# Altium PCB VCU 2026 PCB SID.PcbDoc (part 1 of 2)
Units mm, origin at the board's own origin, x right, y up, seen from the top; angles counter-clockwise.
Board outline 180 x 100 mm, 2 copper layers (Top Layer, Bottom Layer); 108 components, 87 nets, 411 pads, 271 vias.
Unrouted connection lines stored in the file: 2.
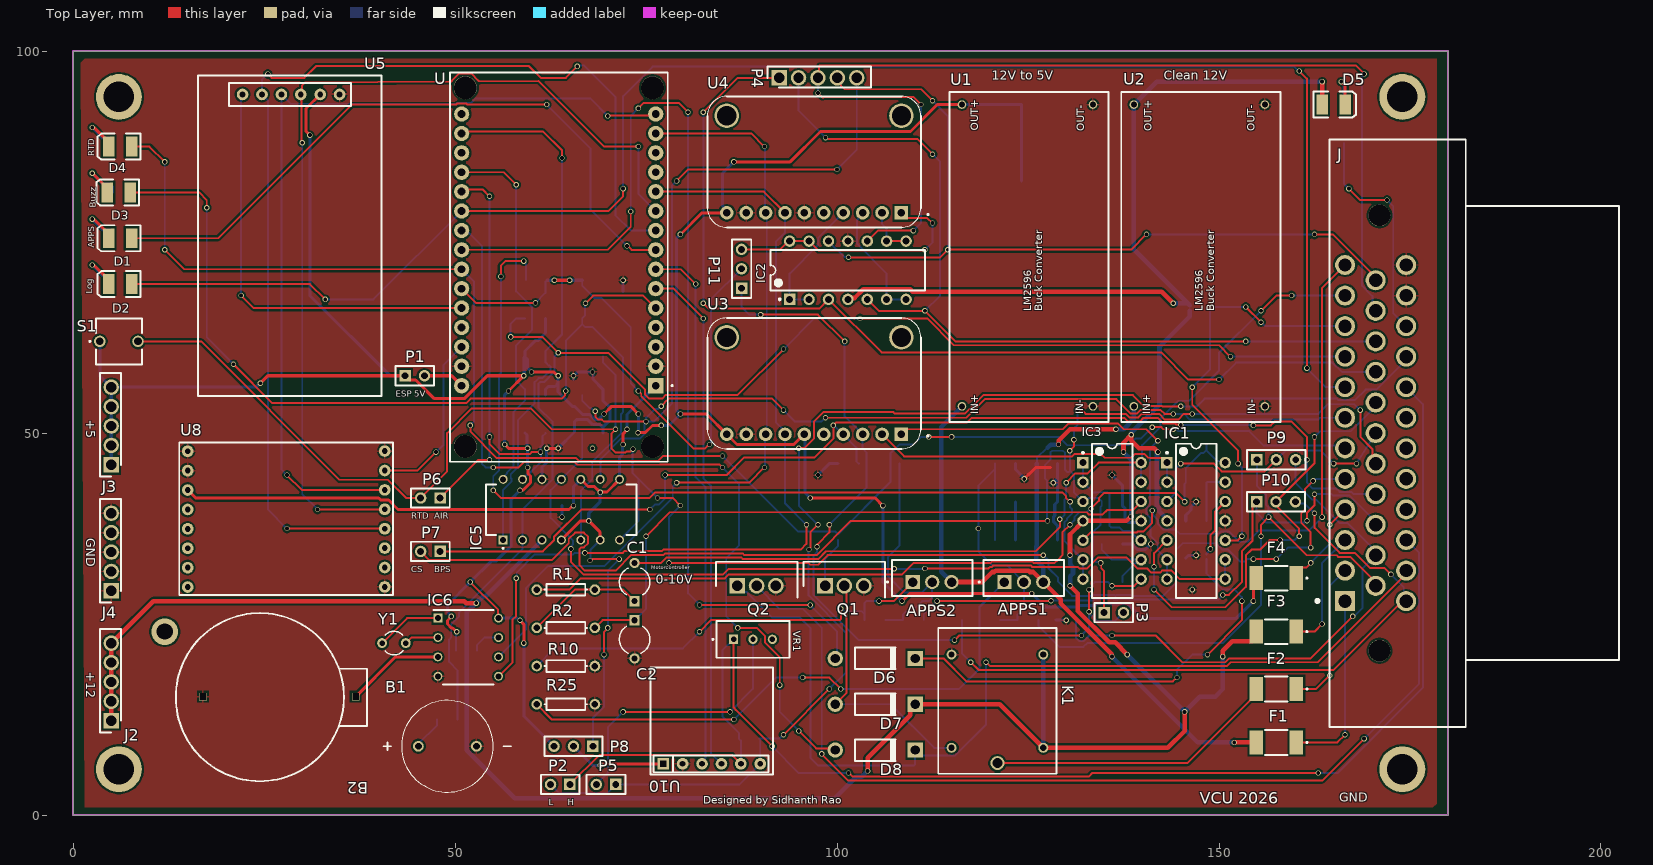
[diagram p0: Top Layer view]
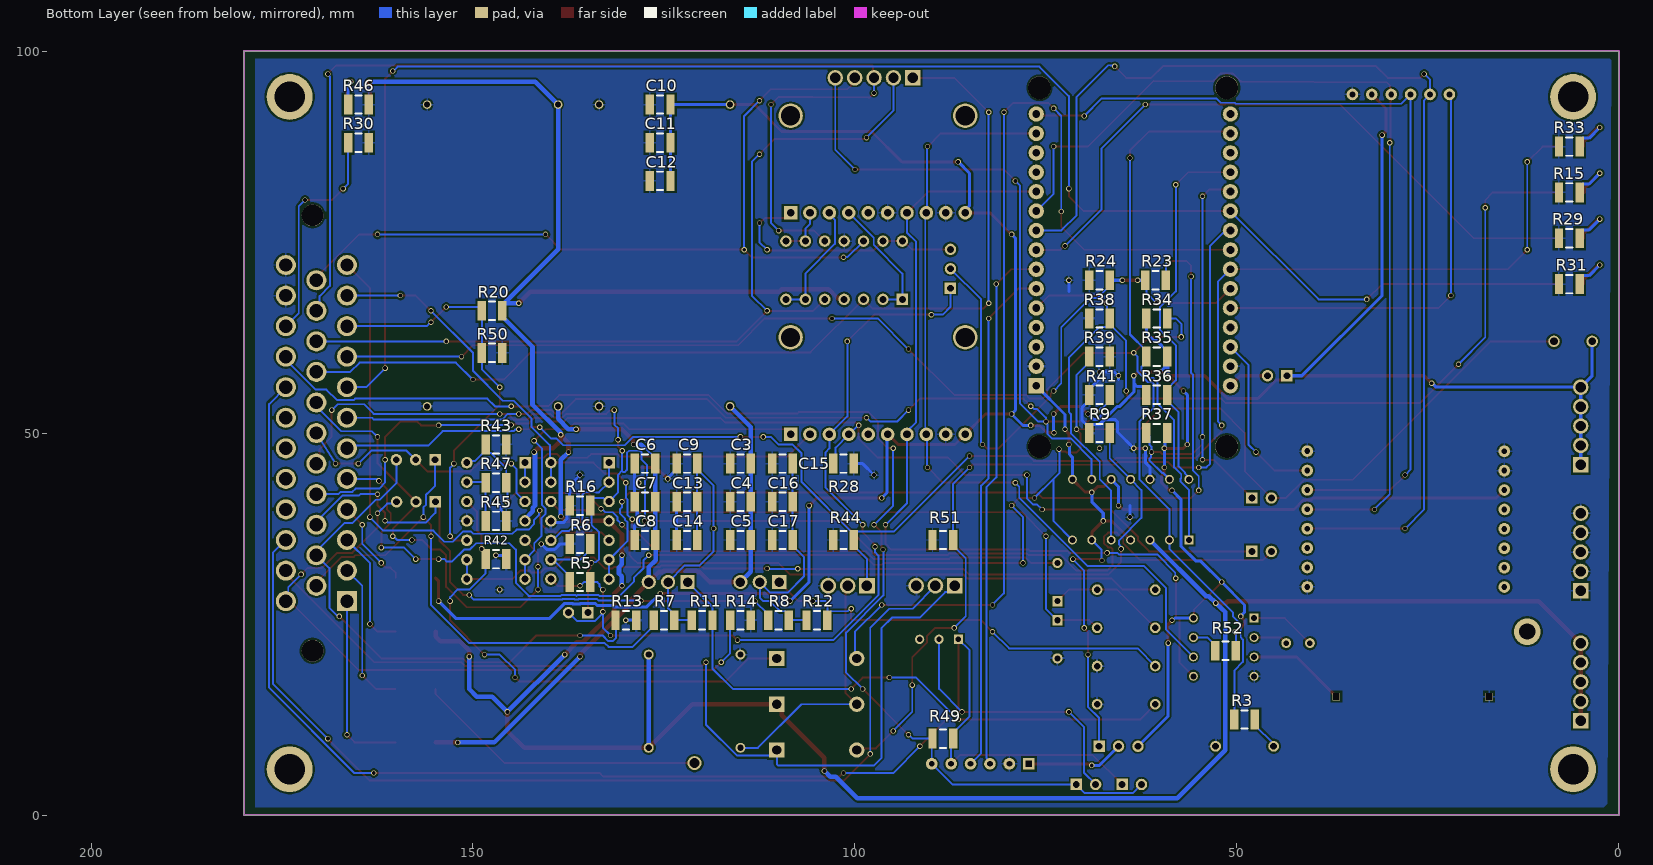
[diagram p1: Bottom Layer view, seen from below]

## Layer stack, top to bottom
Top Solder: solder mask 0.0102, Solder Resist, Dk 3.5
Top Layer: signal copper 0.0356
Dielectric 1: dielectric 0.32, FR-4, Dk 4.8
Bottom Layer: signal copper 0.0356
Bottom Solder: solder mask 0.0102, Solder Resist, Dk 3.5

## Board outline
0,0 0,100 180,100 180,0

## Design rules (kind name [scope] priority, off if disabled: settings)
Clearance SameNetLayer [InNet('GND') vs InNet('GND')] p1: gap=0 ignorepadtopadclearanceinfootprint=FALSE
Clearance [All] p2: gap=0.254 ignorepadtopadclearanceinfootprint=FALSE except(0.3: THPad-Text Via-Text)
HoleSize [All] p1: absolutevalues=TRUE maxlimit=4.5 minlimit=0.025 maxpercent=80.000 minpercent=20.000
PolygonConnect [All] p1: connectstyle=Relief reliefconductorwidth=0.254 reliefentries=4 polygonreliefangle="90 Angle" airgapwidth=0.254
RoutingVias [All] p1: holewidth=0.5 width=0.7 viastyle="Through Hole" minholewidth=0.2 minwidth=0.04 maxholewidth=0.711 maxwidth=1.27
SolderMaskExpansion [All] p1: expansion=0.102 istentingtop=FALSE
SupplyNets "Schematic Supply Nets_3" [InNet('GND')] p1: voltage=0.000
SupplyNets "Schematic Supply Nets_2" [InNet('+12')] p2: voltage=0.000
SupplyNets "Schematic Supply Nets_1" [InNet('LVMSOut')] p3: voltage=0.000
SupplyNets "Schematic Supply Nets" [InNet('+5')] p4: voltage=0.000
Width [All] p1: maxlimit=1 minlimit=0.254 preferedwidth=0.4 minimp=50.000000 maximp=50.000000 favimp=50.000000
29 further rules are at their usual default settings.

## Components (designator, comment, footprint, x,y, rotation, side; value= is the part's Value field where it differs from the comment)
APPS1 "LM317T/NOPB" TO254P1054X470X1955-3 124.46,30.5 r0 top
APPS2 "LM317T/NOPB" TO254P1054X470X1955-3 112.46,30.5 r0 top
B1 "KXG1203C" XDCR_KXG1203C 49,9 r0 top
B2 "CR2025" "Coin Cell" 11.95,4.25 r0 top
C1 "Cap2" CAPR5-4X5 73.5,30.5 r90 top value=10uF
C2 "Cap2" CAPR5-4X5 73.5,23 r270 top value=2.2uF
C3 "Cap Semi" C1210 115,46 r180 bottom value=0.1uF
C4 "Cap Semi" C1210 115,41 r180 bottom value=1uF
C5 "Cap Semi" C1210 115,36 r180 bottom value=10uF
C6 "Cap Semi" C1210 127.5,46 r180 bottom value=0.1uF
C7 "Cap Semi" C1210 127.5,41 r180 bottom value=1uF
C8 "Cap Semi" C1210 127.5,36 r180 bottom value=10uF
C9 "Cap Semi" C1210 122,46 r180 bottom value=0.1uF
C10 "Cap Semi" C1210 125.5,93 r180 bottom value=100pF
C11 "Cap Semi" C1210 125.5,88 r180 bottom value=100pF
C12 "Cap Semi" C1210 125.5,83 r180 bottom value=100pF
C13 "Cap Semi" C1210 122,41 r180 bottom value=1uF
C14 "Cap Semi" C1210 122,36 r180 bottom value=10uF
C15 "Cap Semi" C1210 109.5,46 r180 bottom value=0.1uF
C16 "Cap Semi" C1210 109.5,41 r180 bottom value=1uF
C17 "Cap Semi" C1210 109.5,36 r180 bottom value=10uF
D1 "LED3" 3.5X2.8X1.9 6.152,75.5 r180 top
D2 "LED3" 3.5X2.8X1.9 6.152,69.5 r180 top
D3 "LED3" 3.5X2.8X1.9 6,81.5 r180 top
D4 "LED3" 3.5X2.8X1.9 6.152,87.5 r180 top
D5 "LED3" 3.5X2.8X1.9 165,93 r0 top
D6 "Diode 1N4007" DO-41 105,20.5 r0 top
D7 "Diode 1N4007" DO-41 105,14.5 r0 top
D8 "Diode 1N4007" DO-41 105,8.5 r0 top
F1 "1812L035_60MR" 1812L010DR 157.5,9.5 r180 top
F2 "1812L035_60MR" 1812L010DR 157.5,16.5 r180 top
F3 "1812L035_60MR" 1812L010DR 157.5,24 r180 top
F4 "1812L035_60MR" 1812L010DR 157.5,31 r180 top
IC1 "LM324NE4" DIP-14 147,38.5 r0 top
IC2 "LM324NE4" DIP-14 101.42,71.31 r90 top
IC3 "LM324NE4" DIP-14 136,38.5 r0 top
IC5 "LM339N" DIP794W45P254L1969H508Q14 63.92,39.97 r90 top
IC6 "DS1307" DS1307 52,21.5 r0 top
J "776163-2" TE_776163-2 170.5,50 r90 top
J2 "PPPC051LFBN-RC" RHDR5W80P0X254_1X5_1320X254X870P 5,12.34 r90 top
J3 "PPPC051LFBN-RC" RHDR5W80P0X254_1X5_1320X254X870P 5,45.84 r90 top
J4 "PPPC051LFBN-RC" RHDR5W80P0X254_1X5_1320X254X870P 5,29.34 r90 top
K1 "1393280-5" SRD 121,6.8 r90 top
P1 "Header 2" HDR1X2 43.46,57.5 r0 top
P2 "Header 2" HDR1X2 65.04,4 r180 top
P3 "Header 2" HDR1X2 134.96,26.5 r0 top
P4 "PPPC051LFBN-RC" RHDR5W80P0X254_1X5_1320X254X870P 92.42,96.5 r0 top
P5 "Header 2" HDR1X2 71.04,4 r180 top
P6 "Header 2" HDR1X2 48.04,41.5 r180 top
P7 "Header 2" HDR1X2 48.04,34.5 r180 top
P8 "Header 3" HDR1X3 68.04,9 r180 top
P9 "Header 3" HDR1X3 154.96,46.5 r0 top
P10 "Header 3" HDR1X3 154.92,41 r0 top
P11 "Header 3" HDR1X3 87.5,68.96 r90 top
Q1 "IRF530A" TO254P470X1016X2019-3P 98.43,30 r0 top
Q2 "IRF530A" TO254P470X1016X2019-3P 86.93,30 r0 top
R1 "Res1" AXIAL-0.3 64.5,29.5 r0 top value=15K
R2 "Res1" AXIAL-0.3 64.5,24.5 r0 top value=100K
R3 "Res3" 14-1210 49,12.5 r180 bottom value=1K
R5 "Res3" 14-1210 136,30.5 r0 bottom value=1K
R6 "Res3" 14-1210 136,35.5 r180 bottom value=1K
R7 "Res3" 14-1210 125,25.5 r180 bottom value=5.1K
R8 "Res3" 14-1210 110,25.5 r180 bottom value=5.1K
R9 "Res3" 14-1210 68,50 r0 bottom value=1K
R10 "Res1" AXIAL-0.3 64.5,19.5 r180 top value=2.5K
R11 "Res3" 14-1210 120,25.5 r180 bottom value=1K
R12 "Res3" 14-1210 105,25.5 r180 bottom value=1K
R13 "Res3" 14-1210 130,25.5 r0 bottom value=5.1K
R14 "Res3" 14-1210 115,25.5 r0 bottom value=5.1K
R15 "Res3" 14-1210 6.5,81.5 r180 bottom value=1K
R16 "Res3" 14-1210 136,40.5 r0 bottom value=0.1K
R20 "Res3" 14-1210 147.5,66 r0 bottom value=1K
R23 "Res3" 14-1210 60.658,70 r180 bottom value=1K
R24 "Res3" 14-1210 68,70 r180 bottom value=1K
R25 "Res1" AXIAL-0.3 64.5,14.5 r180 top value=5K
R28 "Res3" 14-1210 101.5,46 r0 bottom value=1K
R29 "Res3" 14-1210 6.5,75.5 r180 bottom value=1K
R30 "Res3" 14-1210 165,88 r180 bottom value=1K
R31 "Res3" 14-1210 6.5,69.5 r180 bottom value=1K
R33 "Res3" 14-1210 6.5,87.5 r180 bottom value=1K
R34 "Res3" 14-1210 60.5,65 r180 bottom value=1K
R35 "Res3" 14-1210 60.5,60 r0 bottom value=1K
R36 "Res3" 14-1210 60.5,55 r180 bottom value=1K
R37 "Res3" 14-1210 60.5,50 r0 bottom value=1K
R38 "Res3" 14-1210 68,65 r0 bottom value=1K
R39 "Res3" 14-1210 68,60 r180 bottom value=1K
R41 "Res3" 14-1210 68,55 r0 bottom value=1K
R42 "Res3" 14-1210 147,33.5 r0 bottom value=1K
R43 "Res3" 14-1210 147,48.5 r0 bottom value=1K
R44 "Res3" 14-1210 101.5,36 r180 bottom value=10k
R45 "Res3" 14-1210 147,38.5 r180 bottom value=1K
R46 "Res3" 14-1210 165,93 r0 bottom value=1K
R47 "Res3" 14-1210 147,43.5 r0 bottom value=10K
R49 "Res3" 14-1210 88.5,10 r180 bottom value=120
R50 "Res3" 14-1210 147.5,60.5 r180 bottom value=1K
R51 "Res3" 14-1210 88.5,36 r180 bottom value=10k
R52 "" 14-1210 51.5,21.5 r180 bottom value=10K
S1 "BUTT-2" SW_BUTT-2 6,62 r0 top
U "ESP32_DEVKIT" ESP32_DEVKIT 63.5,73.5 r180 top
U1 "DC_DC Converter" PCBComponent_1 133.5,53.5 r90 top
U2 "DC_DC Converter" PCBComponent_1 156,53.5 r90 top
U3 "ADS1115" MODULE_ZC261500 97,56.5 r0 top
U4 "ADS1115" MODULE_ZC261500 97,85.5 r0 top
U5 "SD_Logger" SD_Logger 28.5,73.5 r90 top
U8 "Sx1278_LoRA_module" Sx1278_LoRA_module 13.9,28.78 r0 top
U10 "Sn65Hvd230" Sn65Hvd230 84,11 r90 top
VR1 "3296W-1-250" TRIM_3296W-1-250 89,23 r0 top
Y1 "32.768kHz" R38 42,22.5 r90 top

## Footprints (in the part's own frame and the unit in brackets; to place one, negate y for a bottom-side part, rotate by r counter-clockwise, add the part's x,y. Pads: shape width x height; smd on the part's side, far side on the other; paste and mask are expansions set on the pad)
3.5X2.8X1.9 [mm] "SM LED; 2 C-Bend Leads; Body 3.5 x 2.8 x 1.9 mm, inc leads (LxWxH typ)"
  rect 1.5x2.6 smd: 1(-1.5,0) 2(1.5,0)
  silkscreen extent -2.65,-1.7 2.95,1.7
14-1210 [mm] "Chip Resistor, Body 3.2x2.5mm, IPC High Density"
  rect 1.1x2.6 smd: 1(-1.35,0) 2(1.35,0)
  silkscreen extent -0.4,-1.2 0.4,1.2, body extent -1.68,-1.32 1.68,1.32, height 0.9
1812L010DR [mm]
  rect 1.78x3.15 smd: 1(-2.615,0) 2(2.615,0)
  silkscreen extent -4.1,-1.62 1.5,1.62, body extent -2.27,-1.63 2.27,1.63, height 1.8
AXIAL-0.3 [mm] "Axial Device, Thru-Hole; 2 Leads; 0.3 in Pin Spacing"
  round 1.4 hole 0.85: 1(-3.81,0) 2(3.81,0)
  silkscreen extent -2.77,-0.76 2.77,0.76
C1210 [mm] "Chip Capacitor, Body 3.2x2.5mm, IPC High Density"
  rect 1.1x2.6 smd: 1(-1.35,0) 2(1.35,0)
  silkscreen extent -0.4,-1.2 0.4,1.2, body extent -1.7,-1.35 1.7,1.35, height 1.3
CAPR5-4X5 [mm] "Capacitor; 2 Leads"
  rect 1.35x1.35 hole 0.8: 1(-2.5,0)
  round 1.35 hole 0.8: 2(2.5,0)
  silkscreen extent -1.69,-2 1.82,2
"Coin Cell" [mm] "CR2025"
  rect 1x1 hole 0.82 square: 1(5.05,11.25) 2(25.05,11.25)
  silkscreen extent 1.5,0.17 26.55,22.17
DIP794W45P254L1969H508Q14 [mm]
  rect 1.17x1.17 hole 0.77: 1(-3.97,7.62)
  round 1.17 hole 0.77: 2(-3.97,5.08) 3(-3.97,2.54) 4(-3.97,0) 5(-3.97,-2.54) 6(-3.97,-5.08) 7(-3.97,-7.62) 8(3.97,-7.62) 9(3.97,-5.08) 10(3.97,-2.54) 11(3.97,0) 12(3.97,2.54) 13(3.97,5.08) 14(3.97,7.62)
  silkscreen extent -5.15,-9.84 3.3,9.84
DIP-14 [mm] "DIP; 14 Leads; Row Spacing 7.62 mm; Pitch 2.54 mm"
  rect 1.5x1.5 hole 0.9: 1(-3.81,7.62)
  round 1.5 hole 0.9: 2(-3.81,5.08) 3(-3.81,2.54) 4(-3.81,0) 5(-3.81,-2.54) 6(-3.81,-5.08) 7(-3.81,-7.62) 8(3.81,-7.62) 9(3.81,-5.08) 10(3.81,-2.54) 11(3.81,0) 12(3.81,2.54) 13(3.81,5.08) 14(3.81,7.62)
  silkscreen extent -3.93,-10.1 2.65,10.1, body extent -3.6,-10.1 3.6,10.1, height 5.08
DO-41 [mm] "Diode, Axial; Body 5.2 x 2.7 mm (LxDia. max), Lead Dia. 0.86 mm (max)"
  round 2 hole 1.2: 1(-5.23,0)
  rect 2x2 hole 1.2: 2(5.23,0)
  silkscreen extent -2.65,-1.4 2.75,1.4
DS1307 [mm]
  rect 1.16x1.16 hole 0.76: 1(-4.243,4.272)
  round 1.16 hole 0.76: 2(-4.243,1.732) 3(-4.243,-0.808) 4(-4.243,-3.348) 5(3.697,-3.348) 6(3.697,-0.808) 7(3.697,1.732) 8(3.697,4.272)
  silkscreen extent -4.82,-4.43 3.03,5.35, body extent -4.38,-4.27 3.84,5.19, height 4.32
ESP32_DEVKIT [mm]
  rect 2x2 hole 1.02: 1(-12.763,17.301)
  round 2 hole 1.02: 2(-12.763,14.761) 3(-12.763,12.221) 4(-12.763,9.681) 5(-12.763,7.141) 6(-12.763,4.601) 7(-12.763,2.061) 8(-12.763,-0.479) 9(-12.763,-3.019) 10(-12.763,-5.559) 11(-12.763,-8.099) 12(-12.763,-10.639) 13(-12.763,-13.179) 14(-12.763,-15.719) 15(-12.763,-18.259) 16(12.637,-18.259) 17(12.637,-15.719) 18(12.637,-13.179) 19(12.637,-10.639) 20(12.637,-8.099) 21(12.637,-5.559) 22(12.637,-3.019) 23(12.637,-0.479) 24(12.637,2.061) 25(12.637,4.601) 26(12.637,7.141) 27(12.637,9.681) 28(12.637,12.221) 29(12.637,14.761) 30(12.637,17.301)
  round 3 hole 3 unplated: ""(-12.343,25.261) ""(-12.343,-21.689) ""(12.167,25.261) ""(12.167,-21.689)
  silkscreen extent -15.01,-23.69 14.17,27.26
HDR1X2 [mm] "Connector; Header; 2 Position"
  rect 1.5x1.5 hole 0.9: 1(0,0)
  round 1.5 hole 0.9: 2(2.54,0)
  silkscreen extent -1.27,-1.27 3.81,1.27
HDR1X3 [mm] "Connector; Header; 3 Position"
  rect 1.5x1.5 hole 0.9: 1(0,0)
  round 1.5 hole 0.9: 2(2.54,0) 3(5.08,0)
  silkscreen extent -1.27,-1.27 6.35,1.27
MODULE_ZC261500 [mil]
  rect 70x70 hole 39.37: 1(450,-262.5)
  round 70 hole 39.37: 2(350,-262.5) 3(250,-262.5) 4(150,-262.5) 5(50,-262.5) 6(-50,-262.5) 7(-150,-262.5) 8(-250,-262.5) 9(-350,-262.5) 10(-450,-262.5)
  round 125.98 hole 98.43: P1(-450,237.5) P2(450,237.5)
  silkscreen extent -550,-338 591,338
PCBComponent_1 [mm]
  round 1.13 hole 0.78: 1(0,17.145) 2(0,0) 3(39.497,0) 4(39.497,17.145)
  silkscreen extent -2.03,-2.03 41.15,18.8
R38 [mm] "Crystal, Thru-Hole; 2 Leads; Body 3.1 x 8.2 mm (Dia.xH)"
  round 1.3 hole 0.7: 1(0,1.55) 2(0,-1.55)
  silkscreen extent -1.55,-1.19 1.55,1.17
RHDR5W80P0X254_1X5_1320X254X870P [mm]
  rect 2.025x2.025 hole 1.35: 1(0,0)
  round 2.025 hole 1.35: 2(2.54,0) 3(5.08,0) 4(7.62,0) 5(10.16,0)
  silkscreen extent -1.52,-1.27 12.03,1.47, body extent -1.52,-1.27 11.68,1.27, height 8.7
SD_Logger [mil]
  round 60 hole 30: 1(819.72,248.46) 2(819.72,148.46) 3(819.72,48.46) 4(819.72,-51.54) 5(819.72,-151.54) 6(819.72,-251.54)
  silkscreen extent -735,-466 918,478
Sn65Hvd230 [mil] "CAN Transceiver"
  rect 60x60 hole 30 square: 1(-169.29,265.75)
  round 60 hole 30: 2(-169.29,165.75) 3(-169.29,65.75) 4(-169.29,-34.25) 5(-169.29,-134.25) 6(-169.29,-234.25)
  silkscreen extent -224,-299 327,331
SRD [mm]
  round 1.84 hole 1.34: 1(0,0)
  round 1.3 hole 0.8: 2(2,6) 3(2,-6) 4(14.2,6) 5(14.2,-6)
  silkscreen extent -1.4,-7.75 17.7,7.75, body extent -1.35,-7.5 17.65,7.5, height 15.04
SW_BUTT-2 [mm]
  round 1.508 hole 1: 1(-2.5,0) 2(2.5,0)
  silkscreen extent -3.9,-3 3,3
Sx1278_LoRA_module [mil]
  round 60 hole 30: 1(43.31,741.73) 2(43.31,641.73) 3(43.31,541.73) 4(43.31,441.73) 5(43.31,341.73) 6(43.31,241.73) 7(43.31,141.73) 8(43.31,41.73) 9(1059.06,42.52) 10(1059.06,142.52) 11(1059.06,242.52) 12(1059.06,342.52) 13(1059.06,442.52) 14(1059.06,542.52) 15(1059.06,642.52) 16(1059.06,742.52)
  silkscreen extent 0,0 1102,787
TE_776163-2 [mm]
  rect 2.625x2.625 hole 1.75: 1(-22,4)
  round 2.625 hole 1.75: 2(-18,4) 3(-14,4) 4(-10,4) 5(-6,4) 6(-2,4) 7(2,4) 8(6,4) 9(10,4) 10(14,4) 11(18,4) 12(22,4) 13(-20,0) 14(-16,0) 15(-12,0) 16(-8,0) 17(-4,0) 18(0,0) 19(4,0) 20(8,0) 21(12,0) 22(16,0) 23(20,0) 24(-22,-4) 25(-18,-4) 26(-14,-4) 27(-10,-4) 28(-6,-4) 29(-2,-4) 30(2,-4) 31(6,-4) 32(10,-4) 33(14,-4) 34(18,-4) 35(22,-4)
  round 2.85 hole 2.85 unplated: ""(-28.5,-0.5) ""(28.5,-0.5)
  silkscreen extent -38.45,-31.85 38.45,7.82
TO254P470X1016X2019-3P [mm]
  rect 2.055x2.055 hole 1.37: 1(0,0)
  round 2.055 hole 1.37: 2(2.535,0) 3(5.07,0)
  silkscreen extent -2.8,-1.55 7.87,3.15, body extent -2.55,-1.55 7.61,3.15, height 18.54
TO254P1054X470X1955-3 [mm]
  rect 1.86x1.86 hole 1.24: 1(-2.54,0)
  round 1.86 hole 1.24: 2(0,0) 3(2.54,0)
  silkscreen extent -5.94,-1.84 5.27,2.86
TRIM_3296W-1-250 [mm]
  rect 1.218x1.218 hole 0.71: 1(-2.54,0)
  round 1.218 hole 0.71: 2(0,0) 3(2.54,0)
  silkscreen extent -5.35,-2.41 4.76,2.42, body extent -4.76,-2.42 4.76,2.41, height 11.55
XDCR_KXG1203C [mm]
  round 1.408 hole 0.9: N(3.8,0) P(-3.8,0)
  silkscreen extent -8.36,-6 8.36,6

## Part data
APPS1 APPS2 B1 IC5: Package=None, Availability=Unavailable, Price=None
  APPS1 APPS2: MP=LM317T/NOPB
  B1: MP=KXG1203C
  IC5: MP=LM339N
B2: library part "Coin Cell"
C1 C2: "Capacitor", PackageDescription="Capacitor; 2 Leads", PackageReference=CAPR5-4X5, Published=23-Sep-2002, Publisher="Altium Limited"
C3 C4 C5 C6 C7 C8 C9 C10 C11 C12 C13 C14 C15 C16 C17: "Capacitor (Semiconductor SIM Model)", LatestRevisionDate=29-May-2009, LatestRevisionNote="IPC-7351 Footprint Added.", PackageDescription="Chip Capacitor", PackageReference=C1206, Published=8-Jun-2000, Publisher="Altium Limited"
D1 D2 D3 D4 D5: "Typical BLUE SiC LED", DatasheetVersion=16-Apr-2002, LatestRevisionDate=17-Dec-2003, LatestRevisionNote="PCB Footprint replaced.", PackageDescription="SM LED; 2 C-Bend Leads; Body 3.5 x 2.8 x 1.9 mm, inc leads (LxWxH typ)", PackageReference=3.5X2.8X1.9, PackageVersion=16-Apr-2002, Published=8-Jun-2000, Publisher="Altium Limited"
D6 D7 D8: "1 Amp General Purpose Rectifier", Code_JEDEC=DO-204-AL, ComponentLink1Description="Manufacturer Link", ComponentLink1URL=http://www.fairchildsemi.com/, ComponentLink2Description=Datasheet, ComponentLink2URL=http://www.fairchildsemi.com/ds/1N%2F1N4001.pdf, DatasheetVersion=1998, LatestRevisionDate=17-Jul-2002, LatestRevisionNote="Re-released for DXP Platform.", PackageDescription="Diode, Axial; Body 5.2 x 2.7 mm (LxDia. max), Lead Dia. 0.86 mm (max)", PackageReference=DO-41, PackageVersion=Aug-1999, Published=8-Jun-2000, Publisher="Altium Limited"
F1 F2 F3 F4: "Resettable Fuse", Arrow Part Number=1812L035/60MR, Manufacturer_Name=LITTELFUSE, Mouser Part Number=576-1812L035/60MR, Arrow Price/Stock=https://www.arrow.com/en/products/1812l03560mr/littelfuse?region=nac, Datasheet Link=http://www.littelfuse.com/~/media/electronics/datasheets/resettable_ptcs/littelfuse_ptc_1812l_datasheet.pdf.pdf, Height=1.25mm, Manufacturer_Part_Number=1812L035/60MR, Mouser Price/Stock=https://www.mouser.co.uk/ProductDetail/Littelfuse/1812L035-60MR?qs=lM4gFlnEeEOrla%2FeqRq7dw%3D%3D
IC1: "Quad, 30-V, 1.2-MHz operational amplifier", Package="PDIP-14 Texas Instruments", Availability="In Stock", Check_prices=https://www.snapeda.com/parts/LM324NE4/Texas+Instruments/view-part/?ref=eda, MF="Texas Instruments", MP=LM324NE4, Price=None, Purchase-URL=https://pricing.snapeda.com/search/part/LM324NE4/?ref=eda, SnapEDA_Link=https://www.snapeda.com/parts/LM324NE4/Texas+Instruments/view-part/?ref=snap
IC2 IC3: "Integrated Circuit", Manufacturer_Name="Texas Instruments", Mouser Part Number=595-LM324NE4, Arrow Part Number=LM324NE4, Arrow Price/Stock=https://www.arrow.com/en/products/lm324ne4/texas-instruments?region=nac, Datasheet Link=http://www.ti.com/lit/gpn/LM324, Height=5.08mm, Manufacturer_Part_Number=LM324NE4, Mouser Price/Stock=https://www.mouser.co.uk/ProductDetail/Texas-Instruments/LM324NE4?qs=VBduBm9rCJRIL8ASwE2Biw%3D%3D
J: "AMPSEAL 35 Position Panel Mount Three Row Right Angle Natural Header", Package=None, Availability=Unavailable, EU_RoHS_Compliance=Compliant, MF="TE Connectivity", Mouser-Purchase-URL=https://snapeda.com/shop?store=Mouser&id=1413129, MP=776163-2, Price=None, SnapEDA_Link=https://www.snapeda.com/parts/776163-2/TE%20Connectivity%20AMP%20Connectors/view-part/1413129/?ref=snap
J2 J3 J4 P4: "Connector", Manufacturer_Name=Sullins, Datasheet Link=http://www.sullinscorp.com/drawings/78_P(N)PxCxxxLFBN-RC,_10492-H.pdf, Height=8.7mm, Manufacturer_Part_Number=PPPC051LFBN-RC
K1: "Electromechanical Relay 12VDC 254Ohm SPST-NO_13.2x12.2x10.1_mm THT Automotive Relay Automotive", Package=None, Digi-Key_Part_Number=PB1977-ND, Digi-Key_Purchase_URL=https://www.digikey.com/product-detail/en/te-connectivity-potter-brumfield-relays/1393280-5/PB1977-ND/4581694?utm_source=snapeda&utm_medium=aggregator&utm_campaign=symbol, MF="TE Connectivity", MP=1393280-5, SnapEDA_Link=https://www.snapeda.com/parts/1393280-5/TE%20Connectivity%20Potter%20%26%20Brumfield%20Relays/view-part/2683993/?ref=snap, TE_purchase_URL=https://www.te.com/usa-en/product-1393280-5.html?te_bu=Cor&te_type=disp&te_campaign=seda_glo_cor-seda-global-disp-prtnr-fy19-seda-model-bom-cta_sma-317_1&elqCampaignId=32493
P1 P2 P3 P5 P6 P7: "Header, 2-Pin", LatestRevisionDate=17-Jul-2002, LatestRevisionNote="Re-released for DXP Platform.", Publisher="Altium Limited"
P8 P9 P10 P11: "Header, 3-Pin", LatestRevisionDate=17-Jul-2002, LatestRevisionNote="Re-released for DXP Platform.", Publisher="Altium Limited"
Q1 Q2: "MOSFET (N-Channel)", Manufacturer_Name=onsemi, Mouser Part Number=512-IRF530A, Arrow Part Number=IRF530A, Arrow Price/Stock=https://www.arrow.com/en/products/irf530a/on-semiconductor?region=nac, Datasheet Link=https://www.onsemi.com/pub/Collateral/IRF530A-D.pdf, Height=4.7mm, Manufacturer_Part_Number=IRF530A, Mouser Price/Stock=https://www.mouser.co.uk/ProductDetail/ON-Semiconductor-Fairchild/IRF530A/?qs=mdiO5HdF0Kjkiy00QkgAuQ%3D%3D
R1 R2 R3 R5 R6 R7 R8 R9 R10 R11 R12 R13 R14 R15 R16 R20 R23 R24 R25 R28 R29 R30 R31 R33 R34 R35 R36 R37 R38 R39 R41 R42 R43 R44 R45 R46 R47 R49 R50 R51: "Resistor", Published=8-Jun-2000, Publisher="Altium Limited"
  R1 R2 R10 R25: LatestRevisionDate=17-Jul-2002, LatestRevisionNote="Re-released for DXP Platform.", PackageDescription="Axial Device, Thru-Hole; 2 Leads; 0.3 in Pin Spacing", PackageReference=AXIAL-0.3
  R3 R5 R6 R7 R8 R9 R11 R12 R13 R14 R15 R16 R20 R23 R24 R28 R29 R30 R31 R33 R34 R35 R36 R37 R38 R39 R41 R42 R43 R44 R45 R46 R47 R49 R50 R51: LatestRevisionDate=29-May-2009, LatestRevisionNote="IPC-7351 Footprint Added.", PackageDescription="Chip Resistor", PackageReference=J1-0603
R52: library part Res1, "Resistor", LatestRevisionDate=17-Jul-2002, LatestRevisionNote="Re-released for DXP Platform.", PackageDescription="Axial Device, Thru-Hole; 2 Leads; 0.3 in Pin Spacing", PackageReference=AXIAL-0.3, Published=8-Jun-2000, Publisher="Altium Limited"
S1: "Tactile Switches MINI PUSH BUTTON SWITCH 2-PIN QTY. 4", Package=None, Availability="In Stock", Check_prices=https://www.snapeda.com/parts/BUTT-2/Gravitech/view-part/?ref=eda, MF=Gravitech, MP=BUTT-2, Price=None, Purchase-URL=https://pricing.snapeda.com/search/part/BUTT-2/?ref=eda, SnapEDA_Link=https://www.snapeda.com/parts/BUTT-2/Gravitech/view-part/?ref=snap
U1 U2: library part LM2576
U3 U4: library part ZC261500, "ADS1115 Module ADC 4 channel with Pro Gain Amplifier for Arduino RPi", Package=None, Availability=Unavailable, MF=YKS, MP=ZC261500, Price=None, SnapEDA_Link=https://www.snapeda.com/parts/ZC261500/YKS/view-part/621058/?ref=snap
U10: library part "CAN Transceiver"
VR1: "25 Ohms 0.5W, 1/2W PC Pins Through Hole Trimmer Potentiometer Cermet 25.0 Turn Top Adjustment", Package="SOT-23-5 Bourns", Availability="In Stock", Check_prices=https://www.snapeda.com/parts/3296W-1-250/Bourns/view-part/?ref=eda, MF=Bourns, MP=3296W-1-250, Price=None, SnapEDA_Link=https://www.snapeda.com/parts/3296W-1-250/Bourns/view-part/?ref=snap
Y1: library part XTAL, "Crystal Oscillator", LatestRevisionDate=17-Jul-2002, LatestRevisionNote="Re-released for DXP Platform.", PackageDescription="Crystal, Thru-Hole; 2 Leads; Body 3.1 x 8.2 mm (Dia.xH)", PackageReference=R38, Published=8-Jun-2000, Publisher="Altium Limited"

## Free pads (board coordinates)
  round 6 hole 4: 7(6,6) 7(6,94) 7(174,6) 7(174,94)

## Via types
v1: diameter 0.7, hole 0.5, Top Layer to Bottom Layer, 270 vias
v2: diameter 3.5, hole 2.1, Top Layer to Bottom Layer, 1 vias

## Nets (pads, with @x,y where several pads share a name; then routed paths per layer and width w, separated by ;. In a path a pad name is that pad's centre, name@x,y a point inside that pad or via, vN(x,y) a via of type N, cw(c..) or ccw(c..) an arc to the next point about the centre after c; other vN are vias at no path point)
3V3: IC5.4 IC5.6 IC5.8 IC5.10 P8.1 U8.3 U.1 | length 121.5
  Top Layer w0.254: v1(67.675,33.325) 67.795,33.325 67.97,33.5 v1(71.473,33.5) ; v1(69.5,21) 69.5,23.966 70,24.466 v1(70,24.5)
  Top Layer w0.4: U8.3@15,42.54 16.04,41.5 40,41.5 40.264,41.236 41.304,41.236 42.54,40 64.919,40 65.419,40.5 v1(65.5,40.5) ; IC5.4@63.92,36 66.42,38.5 v1(67.5,38.5) 69,37 IC5.6@69,36 ; IC5.10@66.46,43.94 67.4,43 68.231,43 v1(69,42.231) ; v1@68.937,42.099 69.126,42.288 69.888,42.288 IC5.8@71.54,43.94 ; v1(72,48.5) 72,49.919 72.5,50.419 v1(72.5,50.5)
  Bottom Layer w0.254: v1(67.675,33.325) 67.731,33.382 67.731,34.731 IC5.6@69,36 ; P8.1@68.04,9 68.04,12.701 69.5,14.161 v1(69.5,21) ; v1(70,24.5) 70,32 71.473,33.473 v1(71.473,33.5)
  Bottom Layer w0.4: v1(65.5,40.5) 65.5,42.98 IC5.10@66.46,43.94 ; v1(67.5,38.5) 67.5,39.5 69,41 v1(69,42.231) ; IC5.8@71.54,43.94 71.54,46.85 71.943,47.253 71.943,48.443 v1(72,48.5) ; v1(72.5,50.5) 72.5,52.436 U.1@76.263,56.199
+5: C10.2 C11.2 C12.2 F4.2 IC6.8 J3.1 J3.2 J3.3 J3.4 J3.5 P1.1 P8.3 R34.1 R35.1 R36.1 R37.1 R52.2 S1.1 U1.4 U3.6 U3.10 U4.10 U5.5 | length 427.9
  Top Layer w0.254: v1@49.5,25.966 v1(49.5,26) ; 49.509,24.491 49.688,24.491 ; v1@50.18,24 v1(50.231,24) ; v1(52,30.5) 55.646,26.854 55.646,25.823 IC6.8@55.697,25.772 ; v1@58.5,25.466 v1(58.5,25.5)
  Top Layer w0.4: v1(24.517,56.517) 25.5,57.5 P1.1@43.46,57.5 44.01,56.95 44.847,56.95 47.297,54.5 51.22,54.5 54.22,57.5 v1(59,57.5) v1(57,55.5) ; v1(31,89) 30.5,89.5 30.5,92.472 U5.5@32.349,94.321 ; v1@49.5,25.966 49,25.466 49,25 49.509,24.491 ; 49.688,24.491 v1@50.18,24 ; v1(56.5,48.5) 57,48 v1(59.5,48) ; v1@58.5,25.466 59,24.966 v1(59,22.5) ; v1(58.5,42.5) 58.557,42.557 58.927,42.557 59.879,43.51 59.879,44.37 59.557,44.692 59.557,45.443 v1(59.5,45.5) ; v1(60,58) 62.919,58 v1@63.419,57.5 ; v1(69.5,52.5) 70.5,53.5 73,53.5 v1(74,52.5) ; v1(73.955,50.045) 73.974,50.064 74.905,50.064 75.841,51 v1(77,51) ; v1(79.5,52.5) 82.902,52.5 U3.10@85.57,49.832 86.913,48.489 94.352,48.489 95.695,49.832 U3.6@95.73,49.832 ; v1(79.5,76) 82.332,78.832 U4.10@85.57,78.832 ; v1(86.5,85.5) 93.863,85.5 97.841,89.478 109.616,89.478 113.134,92.997 U1.4@116.355,92.997 ; v1(96.5,41.5) 105,41.5 v1(106,40.5) ; v1(108.5,28) 109.5,29 v1(125.5,29) ; v1(154.5,28) 154.5,30.615 F4.2@154.885,31
  Bottom Layer w0.254: v1(49.5,26) v1@49.5,26.034 ; R52.2@50.15,21.5 50.15,23.919 v1(50.231,24) ; 58.107,25.772 58.379,25.5 v1(58.5,25.5)
  Bottom Layer w0.4: S1.1@3.5,62 3.5,57.5 J3.5@5,56 ; J3.1@5,45.84 J3.2@5,48.38 J3.3@5,50.92 J3.4@5,53.46 J3.5@5,56 ; v1(24.517,56.517) 24.436,56.517 23.919,56 J3.5@5,56 ; v1(31,89) 31,68 41.5,57.5 P1.1@43.46,57.5 ; v1@49.5,26.034 49,26.534 49,27.5 v1(52,30.5) 54.725,33.225 55.337,33.225 57.339,35.227 57.339,41.339 v1(58.5,42.5) ; IC6.8@55.697,25.772 58.107,25.772 ; v1(56.5,48.5) 56.5,55 v1(57,55.5) ; v1(59,22.5) 59,12.96 P8.3@62.96,9 ; v1(59,57.5) 59.057,57.557 59.057,59.907 R35.1@59.15,60 ; R37.1@59.15,50 59.443,49.707 59.443,48.057 v1(59.5,48) v1(59.5,45.5) ; v1(60,58) 59.466,58.534 59.466,59.684 R35.1@59.15,60 ; R36.1@61.85,55 61.85,55.75 62.2,56.1 63.1,56.1 63.5,56.5 ; R34.1@61.85,65 61.85,63.1 60.85,62.1 60.5,62.1 59.15,60.75 R35.1@59.15,60 ; v1(63.5,57.5) 63.5,56.5 ; v1(69.5,52.5) 68.759,51.759 68.308,51.759 67.659,52.408 66.75,52.408 65.702,53.456 65.407,53.456 63.5,55.363 63.5,56.5 ; v1(73.955,50.045) 74,50.09 v1(74,52.5) ; v1(77,51) 78,51 v1(79.5,52.5) 79,53 79,75.5 v1(79.5,76) ; U4.10@85.57,78.832 85.57,79.186 85,79.756 85,84 v1(86.5,85.5) ; U3.6@95.73,49.832 95.804,49.758 95.804,42.196 v1(96.5,41.5) ; v1(106,40.5) 106,30.5 v1(108.5,28) ; U1.4@116.355,92.997 124.147,92.997 C10.2@124.15,93 C11.2@124.15,88 C12.2@124.15,83 ; v1(125.5,29) 127.246,27.254 131.558,27.254 131.723,27.419 133.737,27.419 134.022,27.704 135.898,27.704 135.995,27.607 136.904,27.607 137.001,27.704 137.999,27.704 140.007,25.696 152.196,25.696 v1(154.5,28)
+12: D5.1 D7.2 F3.2 IC1.4 IC2.4 IC3.4 IC5.3 J2.1 J2.2 J2.3 J2.4 J2.5 K1.3 K1.5 R20.1 U2.4 | length 418.8
  Top Layer w0.6: J2.1@5,12.34 J2.2@5,14.88 J2.3@5,17.42 J2.4@5,19.96 J2.5@5,22.5 10.5,28 51.217,28 51.484,27.733 v1(52.767,27.733) ; IC2.4@101.42,67.5 101.592,67.672 102.288,67.672 103.42,68.804 109.58,68.804 109.884,68.5 142.5,68.5 v1(144,67) ; v1(104,5.769) 104,7.5 109.579,13.079 109.579,13.849 D7.2@110.23,14.5 121.3,14.5 K1.3@127,8.8 143.3,8.8 145.5,11 v1(145.5,13.5) ; v1(130.5,30) 131.5,29 131.5,26.708 135.612,22.596 136.404,22.596 v1(138,21) ; v1(130.5,34) 130.5,36.716 132.19,38.406 IC3.4@132.19,38.5 137.886,38.5 138.465,39.079 v1(138.492,39.079) ; v1(137.5,47.5) 137.5,48.75 v1(138.519,49.769) 138.519,48.989 ; 138.538,48.989 139.527,48 141.5,48 v1(142,47.5) ; v1(150.5,20.731) 150.5,21.5 151.725,22.725 154.295,22.725 154.885,23.315 F3.2@154.885,24 ; D5.1@163.5,93 v1(163.5,96)
  Bottom Layer w0.6: v1(52.767,27.733) 52.74,27.733 52.01,27.003 51.966,27.003 51.542,26.579 51.542,8.479 57.833,2.188 99.688,2.188 102.514,5.014 103.218,5.014 103.973,5.769 v1(104,5.769) ; v1@52.767,27.779 52.78,27.766 52.8,27.766 53.69,28.656 54.036,28.656 IC5.3@61.38,36 ; K1.3@127,8.8 K1.5@127,21 ; v1(130.5,30) 130.519,30.019 130.519,31.246 130.886,31.613 130.886,32.45 130.519,32.817 130.519,33.981 v1(130.5,34) ; v1(137.5,47.5) 138.492,46.508 v1(138.492,39.079) ; v1(138,21) v1(145.5,13.5) 147.5,15.5 149.5,15.5 150.5,16.5 v1(150.5,20.731) ; v1(138.519,49.769) 138.538,49.788 138.538,50.038 142.21,53.71 142.21,61.31 146.15,65.25 R20.1@146.15,66 ; v1@142,47.473 141.886,47.359 141.886,40.5 142.186,40.2 142.186,39.748 143.19,38.744 IC1.4@143.19,38.5 ; v1(144,67) R20.1@145.9,67 ; R20.1@146.15,66.75 R20.1@145.9,67 ; v1(163.5,96) 141.858,96 U2.4@138.855,92.997 138.855,74.045 R20.1@145.9,67
AIR_Output: IC5.13 P6.1 R37.2 U.20 | length 63.1
  Top Layer w0.254: P6.1@48.04,41.5 53.04,46.5 v1(54.5,46.5) ; U.20@50.863,81.599 51.169,81.905 53.595,81.905 v1(54.5,81) ; v1(54.5,49.5) 54.531,49.469 54.531,48.55 55.834,47.247 59.781,47.247 60.034,47.5 v1(61.188,47.5)
  Bottom Layer w0.254: v1(54.5,46.5) v1(54.5,49.5) v1(54.5,81) ; IC5.13@58.84,43.94 59.669,44.769 59.803,44.769 61.419,46.385 61.419,46.64 61.273,46.786 61.273,47.415 v1(61.188,47.5) ; v1@61.316,47.528 61.269,47.575 61.269,47.697 61.206,47.697 61.197,47.706 61.197,48.231 61.427,48.461 61.427,49.577 R37.2@61.85,50
AIR_State: IC1.10 J.10 R20.2 R50.1 | length 54.4
  Top Layer w0.254: v1(146.5,56) 146.5,53.706 152.5,47.706 v1(152.5,46) ; IC1.10@150.81,35.96 152.46,35.96 v1(153,36.5) ; v1(153.5,66.5) v1(155.5,64.5)
  Bottom Layer w0.254: v1(146.5,56) 148.85,58.35 R50.1@148.85,60.5 R20.2@148.85,66 ; R20.2@148.85,66.15 149.2,66.5 v1(153.5,66.5) ; v1(152.5,46) 152.5,45.966 153,45.466 v1(153,36.5) ; v1(155.5,64.5) 155.581,64.5 156.081,64 J.10@166.5,64
AIR_Statebuff: IC1.8 IC1.9 IC5.11 R9.1 | length 111.4
  Top Layer w0.254: v1(65.16,34.84) 65.16,33.122 66.79,31.492 85.11,31.492 85.849,32.231 v1(107.5,32.231) ; v1(111.5,32.269) 119.806,32.269 120.029,32.492 120.305,32.492 120.478,32.665 125.357,32.665 125.53,32.492 131.519,32.492 131.722,32.289 132.755,32.289 134.197,33.731 137.869,33.731 139.311,32.289 140.575,32.289 141.095,31.769 142.358,31.769 142.6,32.011 143.762,32.011 144.893,30.88 IC1.8@150.81,30.88
  Bottom Layer w0.254: v1(65.16,34.84) 65.245,34.925 65.245,35.245 65.427,35.427 65.427,35.962 62.5,38.889 62.5,42.52 IC5.11@63.92,43.94 66.65,46.67 R9.1@66.65,50 ; v1(107.5,32.231) 111.462,32.231 v1(111.5,32.269) ; IC1.8@150.81,30.88 IC1.9@150.81,33.42
apps1_buff: IC1.1 IC1.2 U3.2 | length 42
  Top Layer w0.254: U3.2@105.89,49.832 108.783,46.94 130.77,46.94 131.081,47.251 134.548,47.251 135.03,46.769 138.497,46.769 138.979,47.251 140.278,47.251 140.76,46.769 140.989,46.769 141.015,46.743 142.567,46.743 IC1.1@143.19,46.12
  Bottom Layer w0.254: IC1.2@143.19,43.58 IC1.1@143.19,46.12
apps1_high: J.13 P9.1 R7.1 | length 71.4
  Top Layer w0.254: v1(155.5,36.5) 155.5,38 156.459,38.959 v1(156.5,39) ; v1@156.5,38.919 156.581,38.919 161.5,34 165.387,34 165.588,33.798 167.2,33.798 170.5,30.498 J.13@170.5,30
  Bottom Layer w0.254: R7.1@126.35,25.5 126.35,24.75 129.1,22 132.252,22 132.752,22.5 150.5,22.5 155.5,27.5 v1(155.5,36.5) ; P9.1@154.96,46.5 154.96,43.102 156,42.062 156.124,41.938 156.124,40.633 156.5,40.257 v1(156.5,39)
apps1_low: J.14 P9.3 R13.2 | length 70.1
  Top Layer w0.254: v1(136,23.5) 141.712,23.5 145.212,20 150.803,20 151.311,20.508 162.008,20.508 v1(167.5,26)
  Bottom Layer w0.254: R13.2@131.35,25.5 131.269,25.419 131.269,23.197 131.697,22.769 132.303,22.769 133.034,23.5 v1(136,23.5) ; P9.3@160.04,46.5 160.04,43.426 162.197,41.269 162.733,41.269 165.768,38.233 166.765,38.233 170.5,34.498 J.14@170.5,34 168.806,32.306 168.806,27.143 167.749,26.085 167.585,26.085 v1(167.5,26)
apps1_val: IC1.3 J.18 P9.2 | length 35.7
  Top Layer w0.254: v1(145,46) 149.331,46 150.342,44.989 155.989,44.989 P9.2@157.5,46.5 ; v1(165,46) v1(168,46)
  Bottom Layer w0.254: IC1.3@143.19,41.04 144.321,42.171 144.321,45.321 v1(145,46) ; P9.2@157.5,46.5 158.704,47.704 163.296,47.704 v1(165,46) ; v1(168,46) J.18@170.5,50
apps2_buff: IC1.6 IC1.7 U3.1 | length 54.9
  Top Layer w0.254: U3.1@108.43,49.832 109.098,50.5 129.537,50.5 130.268,51.231 136.803,51.231 137.534,50.5 140.5,50.5 v1(142,49)
  Bottom Layer w0.254: v1(142,49) 140.941,47.941 140.941,40.572 140.524,40.155 140.524,39.385 141.014,38.895 141.014,36.565 141.983,35.596 141.983,34.627 IC1.6@143.19,33.42 IC1.7@143.19,30.88
apps2_high: J.15 P10.1 R8.1 | length 78.1
  Top Layer w0.254: v1(113.1,28) 113.129,28.029 127.971,28.029 v1(128,28.058) ; v1(150.5,28.804) 151.304,28.804 153,30.5 153,34.5 154.37,35.87 154.37,40.45 P10.1@154.92,41 ; v1(161.517,38.517) 161.5,38.534 161.5,39.534 162.5,40.534 v1(162.5,42)
  Bottom Layer w0.254: R8.1@111.35,25.5 111.35,26.25 v1(113.1,28) ; v1(128,28.058) 133.554,28.058 133.781,28.285 136.139,28.285 136.236,28.188 136.664,28.188 136.761,28.285 138.239,28.285 138.336,28.188 149.884,28.188 v1(150.5,28.804) ; P10.1@154.92,41 154.92,39.546 156.197,38.269 161.148,38.269 161.396,38.517 v1(161.517,38.517) ; v1(162.5,42) 164.758,42 164.959,41.798 167.096,41.798 170.5,38.395 J.15@170.5,38
apps2_low: J.24 P10.3 R14.2 | length 89
  Top Layer w0.254: v1(117.5,20) 117.534,20 118.55,18.984 151.224,18.984 151.232,18.992 162.605,18.992 162.613,19 165,19 174,28 J.24@174.5,28 ; v1(162.5,39.5) 162.5,38.524 162.508,38.516 162.508,37.597 165.799,34.306 167.799,34.306 169.799,32.306 171.694,32.306 v1(172.5,31.5)
  Bottom Layer w0.254: R14.2@116.35,25.5 116.35,21.15 v1(117.5,20) ; P10.3@160,41 160.238,40.762 161.238,40.762 v1(162.5,39.5) ; v1(172.5,31.5) 174.186,29.814 174.186,28.314 J.24@174.5,28
apps2_val: IC1.5 J.19 P10.2 | length 59.9
  Top Layer w0.254: v1(141.5,29.5) 143.804,27.196 150.833,27.196 153.508,29.871 153.508,34.008 154.256,34.756 155.393,34.756 156.637,36 v1(158,36) ; v1(141.5,32.5) 141.5,34.27 IC1.5@143.19,35.96 ; v1(160.5,36.5) 160.5,37.5 157.698,40.302 157.698,40.762 P10.2@157.46,41 162.5,46.04 v1(162.5,49.5)
  Bottom Layer w0.254: v1(141.5,29.5) v1(141.5,32.5) ; v1(158,36) 159.919,36 160.419,36.5 v1(160.5,36.5) ; v1(162.5,49.5) 163.233,50.233 167.232,50.233 170.5,53.502 J.19@170.5,54
AppsLed: D1.1 U.8 | length 88.5
  Top Layer w0.254: D1.1@7.652,75.5 19,75.5 36.5,93 50.151,93 50.291,93.14 51.435,93.14 51.575,93 v1(62,93) ; v1(72.5,74.5) 72.581,74.5 73.102,73.979 U.8@76.263,73.979
  Bottom Layer w0.254: v1(62,93) 67.721,87.279 67.721,79.279 v1(72.5,74.5)
BPS: J.16 P7.1 R28.2 U3.4 | length 147.7
  Top Layer w0.254: P7.1@48.04,34.5 61.5,34.5 62.954,35.954 62.954,36.4 66.554,40 v1(75.5,40) ; v1(77.5,44.5) 85.534,44.5 87.822,46.788 97.021,46.788 99.54,49.306 99.54,50.96 v1(99.5,51) 99.896,51.396 117.026,51.396 117.616,51.987 137.594,51.987 138.042,51.538 139.668,51.538 140.116,51.987 141.956,51.987 142.682,51.261 144.273,51.261 144.39,51.143 144.915,51.143 v1(145,51.058) ; v1(154.5,51) 156.791,51 157.291,51.5 159.5,51.5 161.5,49.5 v1(161.5,46.5)
  Bottom Layer w0.254: v1(75.5,40) 76.141,40.641 76.675,40.641 77.5,41.466 v1(77.5,44.5) ; v1(99.5,51) 99.571,51 100.739,49.832 U3.4@100.81,49.832 102.542,48.1 102.542,46.307 R28.2@102.85,46 ; v1(145,51.058) 145.029,51.029 154.471,51.029 v1(154.5,51) ; v1(161.5,46.5) 161.5,43.53 162.299,42.731 165.374,42.731 165.799,42.306 167.307,42.306 167.613,42 J.16@170.5,42
Buzzer: D3.1 IC5.5 R38.1 U.5 | length 136.1
  Top Layer w0.254: D3.1@7.5,81.5 16.5,81.5 17.5,80.5 v1(17.5,79.5) ; v1(21,59) 26.081,53.919 51.461,53.919 52.042,54.5 63.996,54.5 64.415,54.919 64.415,55.415 v1(64.5,55.5) ; v1(67.081,67) 68.081,68 74.622,68 U.5@76.263,66.359
  Bottom Layer w0.254: v1(17.5,79.5) 17.5,62.534 21,59.034 v1(21,59) ; v1(64.5,55.5) 64.5,62.1 R38.1@66.65,64.25 ; IC5.5@66.46,36 66.46,42.471 67.961,43.972 67.961,46.213 71.731,49.983 71.731,52.489 72,52.758 72,59.842 67.942,63.9 67,63.9 R38.1@66.65,64.25 ; v1(67.081,67) 67.081,66.919 67,66.838 67,65.35 R38.1@66.65,65 R38.1@66.65,64.25
Buzzer*: IC5.2 J.9 R3.1 R34.2 | length 179.4
  Top Layer w0.254: v1(57.285,62.585) 61.415,62.585 v1(63.5,60.5) 70.034,60.5 74.882,55.652 74.882,55.041 75.423,54.5 77.103,54.5 77.611,55.008 87.008,55.008 v1(93,61) ; v1(103,65) 111.782,65 115.29,61.492 150.008,61.492 v1(151.5,60)
  Bottom Layer w0.254: R3.1@50.35,12.5 50.35,18.911 49.219,20.042 49.219,22.958 49.5,23.239 49.5,24.966 50.494,25.96 50.494,26.494 58.84,34.84 IC5.2@58.84,36 58.84,40.034 62.781,43.975 62.781,47.685 62.769,47.697 62.769,48.303 62.781,48.315 62.781,51.458 60.919,53.32 60.919,56.458 61.142,56.681 61.647,56.681 63.008,58.042 63.008,59.958 63.5,60.45 v1(63.5,60.5) ; v1(57.285,62.585) 57.285,64.285 58,65 R34.2@59.15,65 ; v1(93,61) 97,65 v1(103,65) ; v1(151.5,60) J.9@166.5,60
CANH: J.31 P2.1 R49.2 U10.5 VR1.1 | length 190.3
  Top Layer w0.254: P2.1@65.04,4 68.883,7.843 86.267,7.843 U10.5@87.41,6.7 ; VR1.1@86.46,23 86.46,14.074 86.731,13.803 86.731,13.769 v1(91.5,9) ; v1(101.5,5.5) 101.61,5.5 102.072,5.038 132.942,5.038 133.404,5.5 v1(163,5.5)
  Bottom Layer w0.254: VR1.1@86.46,23 85,21.54 85,12.9 87.15,10.75 R49.2@87.15,10 87.41,9.74 U10.5@87.41,6.7 ; v1(91.5,9) 95.001,5.499 101.499,5.499 v1(101.5,5.5) ; v1(163,5.5) 165.534,5.5 176.702,16.668 176.702,53.798 J.31@174.5,56